# Altium PCB MainBoardPCB_4.PcbDoc (part 22 of 32)
Units mm, origin at the board's own origin, x right, y up, seen from the top; angles counter-clockwise.
Board outline 333.63 x 349.38 mm, 16 copper layers (L1, L2 (GND), L3 (Sign), L4 (GND), L5 (Sign), L6 (PWR/GND), L7(PWR/GND), L8 (Plane_GND), L9 (PWR/GND), L10 (PWR/GND), L11 (PWR/GND), L12 (Sign), L13 (GND), L14 (Sign), L15 (GND), L16), stack 2.502 mm thick; 2205 components, 1648 nets, 8314 pads, 3172 vias.
Unrouted connection lines stored in the file: 5141.
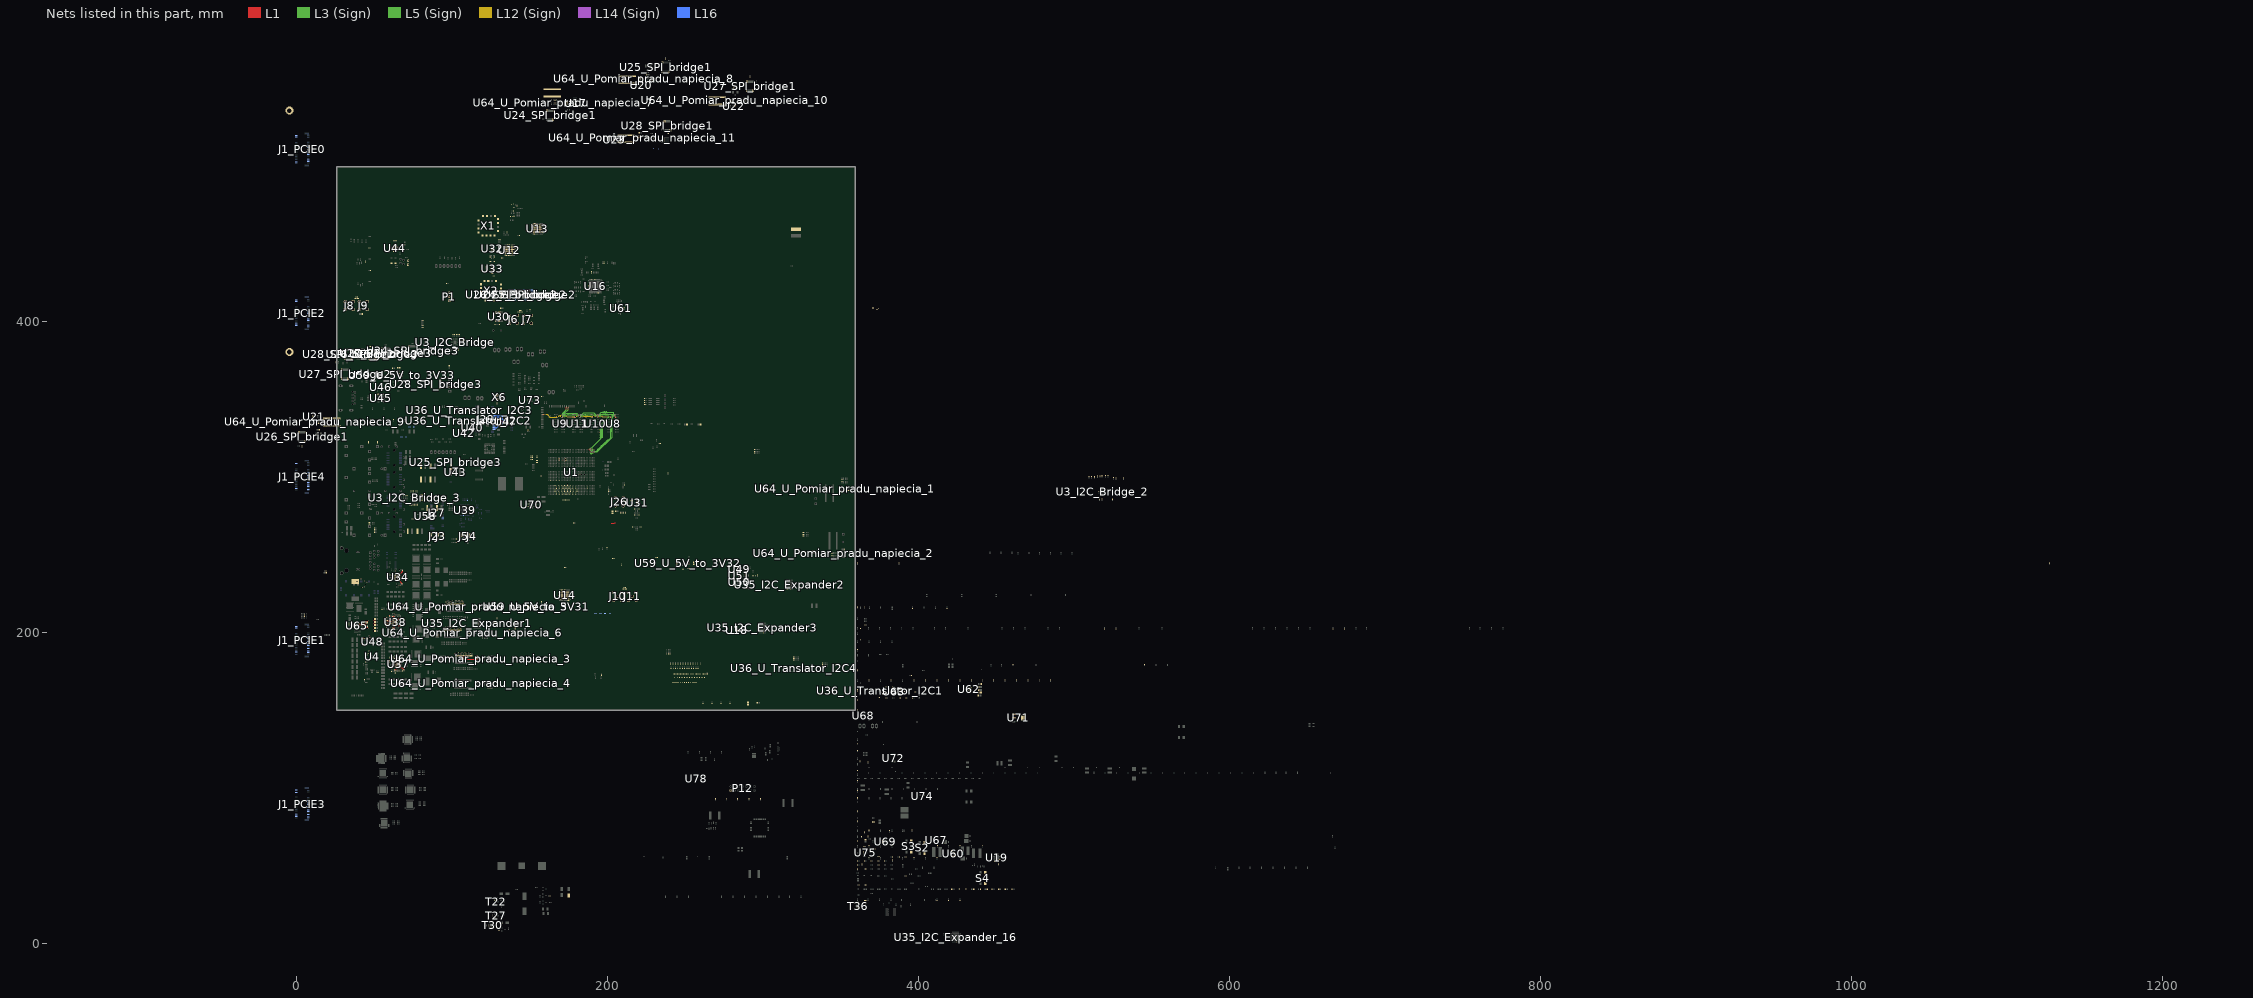
[diagram p22: the nets of this part, all layers, seen from the top]

## Via types
v1: diameter 0.5, hole 0.2, L1 to L16, tented both sides, 1153 vias
v2: diameter 0.5/0.35/0.35/0.35/0.35/0.35/0.35/0.35/0.35/0.35/0.35/0.35/0.35/0.35/0.35/0.5 (per signal layer), hole 0.2, L1 to L16, tented both sides, 548 vias
v3: diameter 0.5, hole 0.2, L1 to L16, 522 vias
v4: diameter 0.5/0.35/0.35/0.35/0.35/0.35/0.35/0.35/0.35/0.35/0.35/0.35/0.35/0.35/0.35/0.5 (per signal layer), hole 0.15, L1 to L16, tented both sides, 266 vias
v5: diameter 0.8, hole 0.4, L1 to L16, tented both sides, 164 vias
v6: diameter 0.35/0/0.35 (per signal layer), hole 0.127, L1 to L3 (Sign), tented both sides, 132 vias
v7: diameter 2.54, hole 1.02, L1 to L16, 125 vias
v8: diameter 1.4, hole 0.5, L1 to L16, tented both sides, 80 vias
v9: diameter 0.35, hole 0.127, L1 to L2 (GND), tented both sides, 36 vias
v10: diameter 0.4, hole 0.2, L1 to L16, 16 vias
v11: diameter 0.25, hole 0.2, L1 to L16, 16 vias
v12: diameter 5, hole 3, L1 to L16, 15 vias
v13: diameter 0.3, hole 0.2, L1 to L16, 15 vias
v14: diameter 0.45, hole 0.15, L1 to L16, 12 vias
v15: diameter 0.5/0.35/0.35/0.35/0.35/0.35/0.35/0.35/0.35/0.35/0.35/0.35/0.35/0.35/0.35/0.45 (per signal layer), hole 0.15, L1 to L16, tented both sides, 10 vias
v16: diameter 0.2/0/0.2 (per signal layer), hole 0.1, L1 to L3 (Sign), tented both sides, 9 vias
v17: diameter 0.4, hole 0.1, L1 to L16, 7 vias
v18: diameter 0.5, hole 0.2, L3 (Sign) to L6 (PWR/GND), tented both sides, 6 vias
v19: diameter 1.65, hole 1.65, L1 to L16, 6 vias
v20: diameter 1.15, hole 1.15, L1 to L16, 6 vias
v21: diameter 0.35/0/0.35 (per signal layer), hole 0.127, L14 (Sign) to L16, tented both sides, 5 vias
v22: diameter 0.2, hole 0.1, L1 to L16, 4 vias
v23: diameter 0.4, hole 0.2, L1 to L16, tented both sides, 2 vias
v24: diameter 0.4, hole 0.15, L1 to L16, 2 vias
v25: diameter 0.508, hole 0.127, L1 to L2 (GND), 2 vias
v26: diameter 0.508, hole 0.127, L2 (GND) to L3 (Sign), 2 vias
v27: diameter 0.5/0.35/0.35/0.35/0.35/0.35/0.35/0.35/0.35/0.35/0.35/0.35/0.35/0.35/0.35/0.5 (per signal layer), hole 0.15, L1 to L16, 2 vias
v28: diameter 0.35, hole 0.127, L3 (Sign) to L6 (PWR/GND), tented both sides, 2 vias
v29: diameter 5.5, hole 3.5, L1 to L16, 1 vias
v30: diameter 0.5/0.35/0.35/0.35/0.35/0.35/0.35/0.35/0.35/0.35/0.35/0.35/0.35/0.35/0.35/0.5 (per signal layer), hole 0.2, L1 to L16, 1 vias
v31: diameter 0.35/0.35/0.35 (per signal layer), hole 0.127, L1 to L3 (Sign), tented both sides, 1 vias
v32: diameter 0.45/0/0.45 (per signal layer), hole 0.15, L1 to L3 (Sign), tented both sides, 1 vias
v33: diameter 0.45/0/0.45 (per signal layer), hole 0.2, L14 (Sign) to L16, tented both sides, 1 vias
v34: diameter 0.35, hole 0.127, L2 (GND) to L3 (Sign), 1 vias
v35: diameter 0.35, hole 0.127, L1 to L2 (GND), 1 vias

## Nets (pads, with @x,y where several pads share a name; then routed paths per layer and width w, separated by ;. In a path a pad name is that pad's centre, name@x,y a point inside that pad or via, vN(x,y) a via of type N, cw(c..) or ccw(c..) an arc to the next point about the centre after c; other vN are vias at no path point) (continued)
3V3_RAIL: C303_I2C_Bridge.2 C303_I2C_Bridge_2.2 C303_I2C_Bridge_3.2 C309_U_Pomiar_pradu_napiecia_1.2 C309_U_Pomiar_pradu_napiecia_2.2 C309_U_Pomiar_pradu_napiecia_3.2 C309_U_Pomiar_pradu_napiecia_4.2 C309_U_Pomiar_pradu_napiecia_5.2 C309_U_Pomiar_pradu_napiecia_6.2 C309_U_Pomiar_pradu_napiecia_7.2 C309_U_Pomiar_pradu_napiecia_8.2 C309_U_Pomiar_pradu_napiecia_9.2 C309_U_Pomiar_pradu_napiecia_10.2 C309_U_Pomiar_pradu_napiecia_11.2 C310.2 C311_I2C_Expander1.2 C311_I2C_Expander2.2 C311_I2C_Expander3.2 C311_I2C_Expander?.2 C311_I2C_Expander_10.2 C311_I2C_Expander_11.2 C311_I2C_Expander_12.2 C311_I2C_Expander_13.2 C311_I2C_Expander_14.2 C311_I2C_Expander_15.2 C311_I2C_Expander_16.2 C324.2 C331.2 C339.2 C545.2 C546.2 C550.2 C552.2 C554.2 C562.2 C585.2 C623.2 C654.2 C676.2 C707.2 C708.2 C721.2 C732.2 C735.2 C792.2 FB1_PCIE0.2 FB1_PCIE1.2 FB1_PCIE2.2 FB1_PCIE3.2 FB1_PCIE4.2 FB23.1 FB24.1 J1_PCIE0.6 J1_PCIE0.8 J1_PCIE0.10 J1_PCIE1.6 J1_PCIE1.8 J1_PCIE1.10 J1_PCIE2.6 J1_PCIE2.8 J1_PCIE2.10 J1_PCIE3.6 J1_PCIE3.8 J1_PCIE3.10 J1_PCIE4.6 J1_PCIE4.8 J1_PCIE4.10 J28.4 L1.1 L2.1 L3.1 L4.1 L5.1 L6.1 L7.1 L8.1 P12.1 R3_I2C_Bridge.2 R3_I2C_Bridge_2.2 R3_I2C_Bridge_3.2 R4_I2C_Bridge.2 R4_I2C_Bridge_2.2 R4_I2C_Bridge_3.2 R5_I2C_Bridge.2 R5_I2C_Bridge_2.2 R5_I2C_Bridge_3.2 R6_I2C_Bridge.2 R6_I2C_Bridge_2.2 R6_I2C_Bridge_3.2 R7_I2C_Bridge.2 R7_I2C_Bridge_2.2 R7_I2C_Bridge_3.2 R8_I2C_Bridge.2 R8_I2C_Bridge_2.2 R8_I2C_Bridge_3.2 R9_I2C_Bridge.2 R9_I2C_Bridge_2.2 R9_I2C_Bridge_3.2 R10_I2C_Bridge.2 R10_I2C_Bridge_2.2 R10_I2C_Bridge_3.2 R11.1 R13.1 R16.1 R29.2 R30.2 R65.2 R66.2 R67.2 R68.2 R71.2 R72.2 R124.2 R175.1 R179.1 R184.1 R188.1 R193.1 R197.1 R202.1 R206.1 R211.1 R219.1 R223_I2C_Bridge.2 R223_I2C_Bridge_2.2 R223_I2C_Bridge_3.2 R224_I2C_Bridge.2 R224_I2C_Bridge_2.2 R224_I2C_Bridge_3.2 R225_I2C_Bridge.2 R225_I2C_Bridge_2.2 R225_I2C_Bridge_3.2 R226_I2C_Bridge.2 R226_I2C_Bridge_2.2 R226_I2C_Bridge_3.2 R227_I2C_Bridge.2 R227_I2C_Bridge_2.2 R227_I2C_Bridge_3.2 R230.1 R231_SPI_bridge1.2 R231_SPI_bridge2.2 R233_SPI_bridge1.2 R233_SPI_bridge2.2 R233_SPI_bridge3.2 R236_SPI_bridge1.2 R236_SPI_bridge2.2 R236_SPI_bridge3.2 R238_SPI_bridge1.2 R240_SPI_bridge1.2 R240_SPI_bridge2.2 R241.2 R243.2 R252.2 R253.2 R281.2 R287.2 R376.2 R377.2 R378.2 R388.1 R425.2 R426.2 R427.2 R428.2 R429.2 R448_U_Pomiar_pradu_napiecia_3.2 R449.2 R451.2 R453.2 R455.2 R458.2 R462.2 R463.1 R468.1 R469.2 R471.2 R473.2 R475.2 R477.2 R479.2 R492.2 R494.2 R496.2 R500.2 R502.2 R504.2 R508.2 R510.2 R512.2 R516.2 R518.2 R520.2 R524.2 R526.2 R528.2 R538.2 R558_I2C_Bridge.2 R558_I2C_Bridge_2.2 R558_I2C_Bridge_3.2 R559_I2C_Bridge.2 R559_I2C_Bridge_2.2 R559_I2C_Bridge_3.2 R560_I2C_Bridge.2 R560_I2C_Bridge_2.2 R560_I2C_Bridge_3.2 R562.1 R566.1 R570.1 R574.1 R578.1 R582.1 R586.1 R590.1 R596.1 R599.2 R600.2 R602.1 R603.1 R604.1 R605.1 R606.1 R630.1 R632.2 R633.2 R634.2 R646.1 R649.1 R676.2 R691.1 R697.2 R699.2 R701.2 R703.2 R705.2 R707.2 R730.2 R731.2 R732.2 R733.2 R734.2 R738.2 R740.2 R742.2 R746.2 R747.2 R748.2 R749.2 R750.2 R751.2 R752.2 R753.2 R754.2 R755.2 R756.2 R757.2 R758.2 R760.2 R762.2 R832.1 R833.1 R834.1 R835.1 U3_I2C_Bridge.21 U3_I2C_Bridge_2.21 U3_I2C_Bridge_3.21 U15.15 U18.C3 U18.D3 U18.D4 U18.E3 U18.E4 U18.F3 U18.F4 U19.13 U19.16 U24_SPI_bridge1.1 U24_SPI_bridge1.7 U24_SPI_bridge1.8 U24_SPI_bridge1.15 U24_SPI_bridge1.16 U24_SPI_bridge2.1 U24_SPI_bridge2.7 U24_SPI_bridge2.8 U24_SPI_bridge2.15 U24_SPI_bridge2.16 U24_SPI_bridge3.1 U24_SPI_bridge3.7 U24_SPI_bridge3.8 U24_SPI_bridge3.16 U25_SPI_bridge1.1 U25_SPI_bridge1.7 U25_SPI_bridge1.8 U25_SPI_bridge1.15 U25_SPI_bridge1.16 U25_SPI_bridge2.1 U25_SPI_bridge2.7 U25_SPI_bridge2.8 U25_SPI_bridge2.15 U25_SPI_bridge2.16 U25_SPI_bridge3.1 U25_SPI_bridge3.7 U25_SPI_bridge3.8 U25_SPI_bridge3.15 U25_SPI_bridge3.16 U26_SPI_bridge1.1 U26_SPI_bridge1.7 U26_SPI_bridge1.8 U26_SPI_bridge1.15 U26_SPI_bridge1.16 U26_SPI_bridge2.1 U26_SPI_bridge2.7 U26_SPI_bridge2.8 U26_SPI_bridge2.15 U26_SPI_bridge2.16 U26_SPI_bridge3.1 U26_SPI_bridge3.7 U26_SPI_bridge3.8 U26_SPI_bridge3.15 U26_SPI_bridge3.16 U27_SPI_bridge1.1 U27_SPI_bridge1.7 U27_SPI_bridge1.8 U27_SPI_bridge1.15 U27_SPI_bridge1.16 U27_SPI_bridge2.1 U27_SPI_bridge2.7 U27_SPI_bridge2.8 U27_SPI_bridge2.16 U27_SPI_bridge3.1 U27_SPI_bridge3.7 U27_SPI_bridge3.8 U27_SPI_bridge3.16 U28_SPI_bridge1.1 U28_SPI_bridge1.7 U28_SPI_bridge1.8 U28_SPI_bridge1.15 U28_SPI_bridge1.16 U28_SPI_bridge2.1 U28_SPI_bridge2.7 U28_SPI_bridge2.8 U28_SPI_bridge2.15 U28_SPI_bridge2.16 U28_SPI_bridge3.1 U28_SPI_bridge3.7 U28_SPI_bridge3.8 U28_SPI_bridge3.16 U35_I2C_Expander1.5 U35_I2C_Expander2.5 U35_I2C_Expander3.5 U35_I2C_Expander_16.5 U36_U_Translator_I2C1.7 U36_U_Translator_I2C2.2 U36_U_Translator_I2C2.7 U36_U_Translator_I2C3.2 U36_U_Translator_I2C3.7 U36_U_Translator_I2C4.7 U45.32 U47.A4 U49.1 U49.2 U50.1 U50.2 U51.1 U51.2 U58.5 U63.3 U64_U_Pomiar_pradu_napiecia_1.6 U64_U_Pomiar_pradu_napiecia_2.6 U64_U_Pomiar_pradu_napiecia_3.6 U64_U_Pomiar_pradu_napiecia_3.8 U64_U_Pomiar_pradu_napiecia_3.9 U64_U_Pomiar_pradu_napiecia_4.6 U64_U_Pomiar_pradu_napiecia_5.6 U64_U_Pomiar_pradu_napiecia_6.6 U64_U_Pomiar_pradu_napiecia_7.6 U64_U_Pomiar_pradu_napiecia_8.6 U64_U_Pomiar_pradu_napiecia_9.6 U64_U_Pomiar_pradu_napiecia_10.6 U64_U_Pomiar_pradu_napiecia_11.6 U67.1 U68.1 U69.1 U69.2 U69.3 U69.15 U69.16 U70.1 U70.2 U70.4 U70.5 U72.6 U73.2 U74.5 U78.5 | length 12.5
  L1 w0.254: U64_U_Pomiar_pradu_napiecia_3.9@116.278,182.659 U64_U_Pomiar_pradu_napiecia_3.8@116.278,183.159 ; U64_U_Pomiar_pradu_napiecia_3.6@116.278,184.159 116.278,184.858 v5(116.281,184.861)
  L1 w0.3: R448_U_Pomiar_pradu_napiecia_3.2@107.759,184.901 107.759,183.101 108.201,182.659 U64_U_Pomiar_pradu_napiecia_3.9@116.278,182.659
  L1 w0.5: v5(52.018,192.237) R630.1@52.018,193.051
  other v5: 112.903,186.048 109.306,186.088 111.104,186.068 107.508,186.109 105.71,186.129 103.911,186.149 102.113,186.169 110.215,186.977 112.014,186.957 108.417,186.998 106.619,187.018 103.022,187.058 104.821,187.038
  other v12: -4.475,380.276
5V_LN: C580.2 R443.2 R608.2 U12.42 U30.1 U30.5 U62.9 U62.10 X2.14
5V_RAIL: C515.2 C516.2 C563_U_5V_to_3V31.2 C563_U_5V_to_3V32.2 C563_U_5V_to_3V33.2 C564_U_5V_to_3V31.2 C564_U_5V_to_3V32.2 C564_U_5V_to_3V33.2 C574.2 C575.2 C720.2 C728.2 C733.2 D23.2 R315.2 R448_U_Pomiar_pradu_napiecia_6.2 R651.2 R656.2 T22.1 T27.2 T30.2 U40.1 U40.2 U40.3 U42.1 U42.2 U42.3 U45.21 U46.C3 U46.D3 U46.D4 U46.E3 U46.E4 U46.F3 U46.F4 U59_U_5V_to_3V31.1 U59_U_5V_to_3V31.2 U59_U_5V_to_3V32.1 U59_U_5V_to_3V32.2 U59_U_5V_to_3V33.1 U59_U_5V_to_3V33.2 U61.1 U61.2 U61.4 U61.5 U64_U_Pomiar_pradu_napiecia_6.8 U64_U_Pomiar_pradu_napiecia_6.9 U73.1
  other v5: 105.778,202.507 102.181,202.548 103.98,202.527 100.383,202.568 98.585,202.588 96.787,202.608 94.988,202.629 103.091,203.437 104.889,203.416 101.292,203.457 99.494,203.477 95.898,203.517 97.696,203.497
12V_HiSpeed: C304.1 C305.1 C306.1 C307.1 C604.2 C714.2 FB34.1 L15.1 R448_U_Pomiar_pradu_napiecia_5.2 R626.2 U17.C3 U17.D3 U17.D4 U17.E3 U17.E4 U17.F3 U17.F4 U19.9 U19.11 U19.26 U19.28 U20.C3 U20.D3 U20.D4 U20.E3 U20.E4 U20.F3 U20.F4 U21.C3 U21.D3 U21.D4 U21.E3 U21.E4 U21.F3 U21.F4 U22.C3 U22.D3 U22.D4 U22.E3 U22.E4 U22.F3 U22.F4 U23.C3 U23.D3 U23.D4 U23.E3 U23.E4 U23.F3 U23.F4 U64_U_Pomiar_pradu_napiecia_5.8 U64_U_Pomiar_pradu_napiecia_5.9 U71.1 | length 0.4
  L1 w0.254: R626.2@59.997,210.611 59.997,210.961
  other v5: 107.235,219.335 105.437,219.355 103.638,219.375 100.042,219.416 101.84,219.395 98.244,219.436 96.446,219.456 106.346,220.244 104.548,220.264 100.951,220.305 102.749,220.284 99.153,220.325 97.355,220.345
12V_PCIE0: R448_U_Pomiar_pradu_napiecia_7.1 U17.C2 U17.D1 U17.D2 U17.E1 U17.E2 U17.F1 U17.F2 U64_U_Pomiar_pradu_napiecia_7.10
12V_PCIE1: R448_U_Pomiar_pradu_napiecia_8.1 U20.C2 U20.D1 U20.D2 U20.E1 U20.E2 U20.F1 U20.F2 U64_U_Pomiar_pradu_napiecia_8.10
12V_PCIE2: R448_U_Pomiar_pradu_napiecia_9.1 U21.C2 U21.D1 U21.D2 U21.E1 U21.E2 U21.F1 U21.F2 U64_U_Pomiar_pradu_napiecia_9.10
12V_PCIE3: R448_U_Pomiar_pradu_napiecia_10.1 U22.C2 U22.D1 U22.D2 U22.E1 U22.E2 U22.F1 U22.F2 U64_U_Pomiar_pradu_napiecia_10.10
12V_PCIE4: R448_U_Pomiar_pradu_napiecia_11.1 U23.C2 U23.D1 U23.D2 U23.E1 U23.E2 U23.F1 U23.F2 U64_U_Pomiar_pradu_napiecia_11.10
+12V_PCIE0: J1_PCIE0.60 J1_PCIE0.62 J1_PCIE0.64 J1_PCIE0.66 R448_U_Pomiar_pradu_napiecia_7.2 U64_U_Pomiar_pradu_napiecia_7.8 U64_U_Pomiar_pradu_napiecia_7.9
+12V_PCIE1: J1_PCIE1.60 J1_PCIE1.62 J1_PCIE1.64 J1_PCIE1.66 R448_U_Pomiar_pradu_napiecia_8.2 U64_U_Pomiar_pradu_napiecia_8.8 U64_U_Pomiar_pradu_napiecia_8.9
+12V_PCIE2: J1_PCIE2.60 J1_PCIE2.62 J1_PCIE2.64 J1_PCIE2.66 R448_U_Pomiar_pradu_napiecia_9.2 U64_U_Pomiar_pradu_napiecia_9.8 U64_U_Pomiar_pradu_napiecia_9.9
+12V_PCIE3: J1_PCIE3.60 J1_PCIE3.62 J1_PCIE3.64 J1_PCIE3.66 R448_U_Pomiar_pradu_napiecia_10.2 U64_U_Pomiar_pradu_napiecia_10.8 U64_U_Pomiar_pradu_napiecia_10.9
+12V_PCIE4: J1_PCIE4.60 J1_PCIE4.62 J1_PCIE4.64 J1_PCIE4.66 R448_U_Pomiar_pradu_napiecia_11.2 U64_U_Pomiar_pradu_napiecia_11.8 U64_U_Pomiar_pradu_napiecia_11.9
\I\N\T\: R709.2 U39.44
\M\R\: D11.1 D12.1 P5.1 R371.1 U44.13
ADP1741_3.6V: C308.2 C354.2 C355.2 C570.2 C603.2 L13.2 R113.2 U60.1 U60.2 U60.3 U60.15 U60.16
ADP1741_EN: U35_I2C_Expander2.18 U60.4
ADP1741_PG: U35_I2C_Expander2.2 U60.5
ADP_Vin_1: C395.2 R285.2 U37.3
ADP_Vin_2: C436.2 R303.2 U38.3 | length 2.8
  L1 w0.254: C436.2@58.746,207.523 59.82,207.523 60.129,207.214 U38.3@61.453,207.214
AGND: C45.1 C46.1 C55.1 C56.1 C57.1 C58.1 C59.1 C60.1 C61.1 C62.1 C65.1 C66.1 C68.1 C69.1 C71.1 C72.1 C73.1 C74.1 C84.1 C85.1 C86.1 C87.1 C94.1 C95.1 C97.1 C98.1 C111.1 C112.1 C113.1 C114.1 C115.1 C116.1 C117.1 C118.1 C119.1 C120.1 C121.1 C122.1 C123.1 C128.1 C129.1 C130.1 C131.1 C132.1 C133.1 C134.1 C135.1 C136.1 C137.1 C138.1 C139.1 C140.1 C149.1 C150.1 C151.1 C152.1 C153.1 C154.1 C155.1 C156.1 C157.1 C158.1 C159.1 C160.1 C161.1 C166.1 C167.1 C168.1 C169.1 C170.1 C171.1 C172.1 C173.1 C174.1 C175.1 C176.1 C177.1 C178.1 C181.1 C182.1 C183.1 C184.1 C185.1 C186.1 C187.1 C188.1 C189.1 C190.1 C191.1 C192.1 C193.1 C194.1 C195.1 C196.1 C197.1 C198.1 C199.1 C200.1 C201.1 C202.1 C203.1 C204.1 C205.1 C206.1 C322.1 C323.1 C324.1 C326.1 C327.1 C328.1 C329.1 C335.1 C336.1 C337.1 C338.1 C339.1 C340.1 C344.2 C563_U_5V_to_3V31.1 C563_U_5V_to_3V32.1 C563_U_5V_to_3V33.1 C564_U_5V_to_3V31.1 C564_U_5V_to_3V32.1 C564_U_5V_to_3V33.1 C565_U_5V_to_3V31.1 C565_U_5V_to_3V32.1 C565_U_5V_to_3V33.1 C566_U_5V_to_3V31.1 C566_U_5V_to_3V32.1 C566_U_5V_to_3V33.1 C567_U_5V_to_3V31.1 C567_U_5V_to_3V32.1 C567_U_5V_to_3V33.1 C568.1 C569.1 C570.1 C571.2 C580.1 C581.1 C582.1 C583.1 C584.1 C713.1 C714.1 FB35.2 J2.1 J2.3 J3.1 J3.3 J4.1 J4.3 J5.1 J5.3 J6.2 J6.3 J6.4 J6.5 J7.2 J7.3 J7.4 J7.5 J8.2 J8.3 J8.4 J8.5 J9.2 J9.3 J9.4 J9.5 J10.2 J10.3 J10.4 J10.5 J11.2 J11.3 J11.4 J11.5 J26.2 J26.3 J26.4 J26.5 R246.1 R247.1 R248.1 R249.2 R254.1 R255.1 R256.1 R258.2 R261.1 R262.1 R263.1 R264.1 R265.1 R291.2 R301.2 R387.1 R432_U_5V_to_3V31.1 R432_U_5V_to_3V32.1 R432_U_5V_to_3V33.1 R434.1 R444.1 R445.1 R482.2 R483.2 R487.1 R536.2 R537.1 R609.1 T36.2 U12.36 U12.41 U12.53 U13.36 U13.41 U13.53 U14.36 U14.41 U14.53 U31.1 U31.2 U31.17 U32.1 U32.17 U33.5 U33.6 U33.14 U33.17 U59_U_5V_to_3V31.4 U59_U_5V_to_3V31.9 U59_U_5V_to_3V32.4 U59_U_5V_to_3V32.9 U59_U_5V_to_3V33.4 U59_U_5V_to_3V33.9 U60.6 U60.17 U62.5 U62.8 U62.11 U71.2 X1.1 X1.3 X1.4 X1.5 X1.6 X1.7 X1.8 X1.9 X1.11 X1.12 X1.13 X1.15 X1.16
  other v3: 421.804,57.122 422.904,57.122 421.804,58.222 422.904,58.222 431.927,162.814 432.689,162.814 431.927,163.576 432.689,163.576 431.927,164.338 432.689,164.338 153.862,215.991 154.862,215.991 153.862,216.991 154.862,216.991 169.726,221.726 170.826,221.726 171.926,221.726 173.026,221.726 174.126,221.726 175.226,221.726 169.726,222.826 170.826,222.826 171.926,222.826 173.026,222.826 174.126,222.826 175.226,222.826 169.726,223.926 170.826,223.926 171.926,223.926 173.026,223.926 174.126,223.926 175.226,223.926 169.726,225.026 170.826,225.026 171.926,225.026 173.026,225.026 174.126,225.026 175.226,225.026 169.726,226.126 170.826,226.126 171.926,226.126 173.026,226.126 174.126,226.126 175.226,226.126 251.341,243.886 252.341,243.886 251.341,244.886 252.341,244.886 67.28,364.904 68.28,364.904 67.28,365.904 68.28,365.904 134.296,443.43 135.396,443.43 136.496,443.43 137.596,443.43 138.696,443.43 139.796,443.43 134.296,444.53 135.396,444.53 136.496,444.53 137.596,444.53 138.696,444.53 139.796,444.53 134.296,445.63 135.396,445.63 136.496,445.63 137.596,445.63 138.696,445.63 139.796,445.63 134.296,446.73 135.396,446.73 136.496,446.73 137.596,446.73 138.696,446.73 139.796,446.73 134.296,447.83 135.396,447.83 136.496,447.83 137.596,447.83 138.696,447.83 139.796,447.83 152.3,457.342 153.4,457.342 154.5,457.342 155.6,457.342 156.7,457.342 157.8,457.342 152.3,458.442 153.4,458.442 154.5,458.442 155.6,458.442 156.7,458.442 157.8,458.442 152.3,459.542 153.4,459.542 154.5,459.542 155.6,459.542 156.7,459.542 157.8,459.542 152.3,460.642 153.4,460.642 154.5,460.642 155.6,460.642 156.7,460.642 157.8,460.642 152.3,461.742 153.4,461.742 154.5,461.742 155.6,461.742 156.7,461.742 157.8,461.742
  other v10: 125.627,433.289 126.577,433.289 125.627,434.239 126.577,434.239
  other v12: -4.475,535.508
AGND_1: C389.1 C393.1 C395.1 C398.1 C399.1 C639.1 C640.1 C641.1 C642.1 C643.1 C644.1 R290.1 R294.1 R300.1 U37.6 U37.33
  other v3: 64.825,178.017 66.025,178.017 63.875,178.967 64.825,178.967 66.025,178.967 66.975,178.967 63.875,180.167 64.825,180.167 66.025,180.167 66.975,180.167 64.825,181.117 66.025,181.117
AGND_2: C430.1 C434.1 C436.1 C439.1 C440.1 C548.1 C549.1 C647.1 C648.1 C650.1 C652.1 R312.1 R318.1 R627.1 U38.6 U38.33 | length 7.4
  L1 w0.254: R312.1@57.926,204.716 57.926,205.54 57.15,206.316 57.15,207.205 57.468,207.523 C436.1@57.967,207.523 ; 57.937,205.529 59.906,205.529 60.091,205.714 U38.6@61.453,205.714
  other v3: 63.103,204.914 64.303,204.914 62.153,205.864 63.103,205.864 64.303,205.864 65.253,205.864 62.153,207.064 63.103,207.064 64.303,207.064 65.253,207.064 63.103,208.014 64.303,208.014
  other v14: 60.944,210.483 62.953,211.029 63.953,211.044 62.838,212.229
Analog_In5: U1.AD14
  other v2: 185.397,301.539
Analog_In6: U1.AA14
  other v2: 182.397,301.539
Analog_In7: U1.AB14
  other v2: 183.397,301.539
ANGD: C345.1 C349.1 C351.1 C356.1 C357.1 C358.2 C634.1 C635.1 R273.1 U34.6 U34.33
  other v3: 64.472,233.839 65.672,233.839 63.522,234.789 64.472,234.789 65.672,234.789 66.622,234.789 63.522,235.989 64.472,235.989 65.672,235.989 66.622,235.989 64.472,236.939 65.672,236.939
  other v14: 66.055,230.182 64.44,230.197 59.876,233.839 60.241,236.629 63.839,239.52 66.32,240.47
B223_Rx0_N: J1_PCIE0.47 U1.W3
B223_Rx0_P: J1_PCIE0.49 U1.W4
B223_Rx1_N: J1_PCIE0.35 U1.V5
B223_Rx1_P: J1_PCIE0.37 U1.V6
B223_Rx2_N: J1_PCIE1.47 U1.T5
B223_Rx2_P: J1_PCIE1.49 U1.T6
B223_Rx3_N: J1_PCIE1.35 U1.R3
B223_Rx3_P: J1_PCIE1.37 U1.R4
B223_Tx0_to_C_N: C268.1 J1_PCIE0.41
B223_Tx0_to_C_P: C267.1 J1_PCIE0.43
B223_Tx0C_to_B_N: C268.2 U1.V1
B223_Tx0C_to_B_P: C267.2 U1.V2
B223_Tx1_to_C_N: C270.1 J1_PCIE0.29
B223_Tx1_to_C_P: C269.1 J1_PCIE0.31
B223_Tx1C_to_B_N: C270.2 U1.U3
B223_Tx1C_to_B_P: C269.2 U1.U4
B223_Tx2_to_C_N: C272.1 J1_PCIE1.41
B223_Tx2_to_C_P: C271.1 J1_PCIE1.43
B223_Tx2C_to_B_N: C272.2 U1.T1
B223_Tx2C_to_B_P: C271.2 U1.T2
B223_Tx3_to_C_N: C275.1 J1_PCIE1.29
B223_Tx3_to_C_P: C274.1 J1_PCIE1.31
B223_Tx3C_to_B_N: C275.2 U1.P1
B223_Tx3C_to_B_P: C274.2 U1.P2
B224_Rx0_N: J1_PCIE2.47 U1.P5
B224_Rx0_P: J1_PCIE2.49 U1.P6
B224_Rx1_N: J1_PCIE2.35 U1.M5
B224_Rx1_P: J1_PCIE2.37 U1.M6
B224_Rx2_N: J1_PCIE3.47 U1.L3
B224_Rx2_P: J1_PCIE3.49 U1.L4
B224_Rx3_N: J1_PCIE3.35 U1.K5
B224_Rx3_P: J1_PCIE3.37 U1.K6
B224_Tx0_to_C_N: C280.1 J1_PCIE2.41
B224_Tx0_to_C_P: C279.1 J1_PCIE2.43
B224_Tx0C_to_B_N: C280.2 U1.N3
B224_Tx0C_to_B_P: C279.2 U1.N4
B224_Tx1_to_C_N: C282.1 J1_PCIE2.29
B224_Tx1_to_C_P: C281.1 J1_PCIE2.31
B224_Tx1C_to_B_N: C282.2 U1.M1
B224_Tx1C_to_B_P: C281.2 U1.M2
B224_Tx2_to_C_N: C284.1 J1_PCIE3.41
B224_Tx2_to_C_P: C283.1 J1_PCIE3.43
B224_Tx2C_to_B_N: C284.2 U1.K1
B224_Tx2C_to_B_P: C283.2 U1.K2
B224_Tx3_to_C_N: C287.1 J1_PCIE3.29
B224_Tx3_to_C_P: C286.1 J1_PCIE3.31
B224_Tx3C_to_B_N: C287.2 U1.J3
B224_Tx3C_to_B_P: C286.2 U1.J4
B225_Rx0_N: J1_PCIE4.47 U1.H5
B225_Rx0_P: J1_PCIE4.49 U1.H6
B225_Rx1_N: J1_PCIE4.35 U1.G7
B225_Rx1_P: J1_PCIE4.37 U1.G8
B225_Rx2_N: J1_PCIE4.23 U1.F5
B225_Rx2_P: J1_PCIE4.25 U1.F6
  other v2: 167.397,293.539
B225_Rx3_N: J1_PCIE4.11 U1.E7
B225_Rx3_P: J1_PCIE4.13 U1.E8
B225_Tx0_to_C_N: C292.1 J1_PCIE4.41
B225_Tx0_to_C_P: C291.1 J1_PCIE4.43
B225_Tx0C_to_B_N: C292.2 U1.H1
B225_Tx0C_to_B_P: C291.2 U1.H2
B225_Tx1_to_C_N: C294.1 J1_PCIE4.29
B225_Tx1_to_C_P: C293.1 J1_PCIE4.31
B225_Tx1C_to_B_N: C294.2 U1.G3
B225_Tx1C_to_B_P: C293.2 U1.G4
  other v2: 168.397,291.539
B225_Tx2_to_C_N: C296.1 J1_PCIE4.19
B225_Tx2_to_C_P: C295.1 J1_PCIE4.17
B225_Tx2C_to_B_N: C296.2 U1.F1
B225_Tx2C_to_B_P: C295.2 U1.F2
B225_Tx3_to_C_N: C299.1 J1_PCIE4.7
B225_Tx3_to_C_P: C298.1 J1_PCIE4.5
B225_Tx3C_to_B_N: C299.2 U1.E3
B225_Tx3C_to_B_P: C298.2 U1.E4
B503_Ground: C531.2 C532.2 C533.2 C534.2 C535.1 C536.1 P5.2 R358.2 R359.2 R360.2 R361.2 R373.1 R720.2 S2.3 S2.4 S3.3 S3.4 S4.3 S4.4 U43.9 U43.10 U44.4 U44.5 U44.17 X6.2 | length 0.9
  L1 w0.2: C535.1@148.603,330.314 C536.1@149.543,330.314
  other v3: 62.87,446.303 63.97,446.303 62.87,447.403 63.97,447.403
  other v34: 149.073,330.314
  other v35: 149.073,330.314
Bank223_MGTREF0_C_N: C276.1 U1.R7
Bank223_MGTREF0_C_P: C273.1 U1.R8
Bank223_MGTREF1_C_N: C278.1 U1.N7
Bank223_MGTREF1_C_P: C277.1 U1.N8
  other v2: 174.397,295.539
Bank224_MGTREF0_C_N: C288.1 U1.L7
Bank224_MGTREF0_C_P: C285.1 U1.L8
Bank224_MGTREF1_C_N: C290.1 U1.J7
Bank224_MGTREF1_C_P: C289.1 U1.J8
Bank225_MGTREF0_C_N: C300.1 U1.H9
Bank225_MGTREF0_C_P: C297.1 U1.H10
Bank225_MGTREF1_C_N: C302.1 U1.F9
Bank225_MGTREF1_C_P: C301.1 U1.F10
Bank505_MGTRREF0_C_N: C526.2 R69.2 U1.M24 | length 0.7
  L1 w0.116: v2(172.909,311.052) U1.M24@173.397,311.539
Bank505_MGTRREF0_C_P: C525.2 R69.1 U1.M23 | length 0.7
  L1 w0.116: v2(172.909,310.052) U1.M23@173.397,310.539
Bank505_MGTRREF2_C_N: C528.2 R126.2 U1.K24
  other v2: 171.397,311.539
Bank505_MGTRREF2_C_P: C527.2 R126.1 U1.K23
  other v2: 171.397,310.539
Bank505_MGTRREF3_C_N: C530.2 R70.2 U1.H24 | length 0.7
  L1 w0.116: v2(168.909,312.027) U1.H24@169.397,311.539
Bank505_MGTRREF3_C_P: C529.2 R70.1 U1.H23 | length 0.7
  L1 w0.116: v2(168.909,311.027) U1.H23@169.397,310.539
Battery_PWR: P11.1 R679.2 R680.2 U48.2 | length 1.6
  L1 w0.5: R680.2@43.658,195.933 v5(43.658,196.747) ; R679.2@45.775,195.933 v5(45.775,196.747)
  other v5: 46.906,196.145 48.155,196.145 47.566,196.91 46.907,197.647
  other v10: 48.327,194.383
BST1: C346.1 U34.25 | length 2.7
  L1 w0.254: U34.25@66.822,237.639 66.822,237.71 66.824,237.712 66.895,237.712 68.336,239.154 C346.1@68.336,239.69
BST1_1: C390.1 U37.25
BST1_2: C431.1 U38.25 | length 1.7
  L1 w0.254: U38.25@65.453,208.714 66.596,208.714 66.996,209.114 C431.1@67.001,209.114
BST2: C350.1 U34.16 | length 2.6
  L1 w0.254: U34.16@66.822,233.139 66.822,232.556 67.929,231.449 67.929,231.245 C350.1@68.072,231.102
BST2_1: C394.1 U37.16 | length 2.8
  L1 w0.254: U37.16@67.175,177.317 68.028,177.317 69.151,176.194 C394.1@69.151,175.817
BST2_2: C435.1 U38.16 | length 1.7
  L1 w0.254: U38.16@65.453,204.214 66.661,204.214 67.011,203.864 C435.1@67.016,203.864
CAN1_RxD: R798.1 U63.1
CAN1_TxD: R799.1 U63.4
CAN_H: P6.2 R446.2 R447.2 U63.7 U75.2
CAN_L: P6.1 R446.1 R447.1 U63.6 U75.1
CD_H: J28.9 R381.1 R782.1 U47.D3
Charge_CAP_KEY: R658.2
CLK_Fanout_In_N: U1.AF5
CLK_Fanout_In_P: U1.AF6
CLK_GTR_T1_N: C528.1
CLK_GTR_T1_P: C527.1
CLK_GTR_T2_N: C526.1
CLK_GTR_T2_P: C525.1
CLK_GTR_T3_N: C530.1
CLK_GTR_T3_P: C529.1
CLK_Hi_Rail1_N: R270.1 U12.33 U13.38
CLK_Hi_Rail1_P: R270.2 U12.34 U13.37
CLK_Hi_Rail1_SysRef_N: R534.1 U12.30 U13.48
CLK_Hi_Rail1_SysRef_P: R534.2 U12.31 U13.47
CLK_Hi_Rail2_N: R539.1 U12.6 U14.38
CLK_Hi_Rail2_P: R539.2 U12.7 U14.37
CLK_Hi_Rail2_SysRef_N: R535.1 U12.3 U14.48
CLK_Hi_Rail2_SysRef_P: R535.2 U12.4 U14.47
CLK_M_OSC_In: C333.1 R257.2 U33.2 | length 2.7
  L1 w0.116: 202.539,270.281 202.585,270.281 203.543,270.281 204.555,270.281 204.674,270.4 205.194,270.4
CLK_NVME_Conn_N: J27.53 U14.13
CLK_NVME_Conn_P: J27.55 U14.12
CLK_Q223_T1_N: C276.2
CLK_Q223_T1_P: C273.2
CLK_Q224_T1_N: C288.2
CLK_Q224_T1_P: C285.2
CLK_Q225_T1_N: C300.2
CLK_Q225_T1_P: C297.2
CLK_Q226_T1_N: U1.B9
CLK_Q226_T1_P: U1.B10
CLK_SMA0_C_N: C48.2 J6.1
CLK_SMA0_C_P: C47.2 J7.1
CLK_SMA0_N: C48.1 R78.1 U12.9
CLK_SMA0_P: C47.1 R78.2 U12.10
CLK_SMA1_C_N: C50.2 J8.1
CLK_SMA1_C_P: C49.2 J9.1
CLK_SMA1_N: C50.1 R79.1 U13.3
CLK_SMA1_P: C49.1 R79.2 U13.4
CLK_SMA2_C_N: C52.2 J10.1
CLK_SMA2_C_P: C51.2 J11.1
CLK_SMA2_N: C52.1 R80.1 U14.34
CLK_SMA2_P: C51.1 R80.2 U14.33
CLKREF_R: R375.1 X6.3
CLKREQ: J27.52
CMD_SD: J28.3 U47.D4 | length 8
  L14 (Sign) w0.098: v33(129.927,337.233) 131.355,335.804 133.045,335.804 133.445,335.404 133.929,335.404 v21(134.329,335.004)
  L16 w0.098: J28.3@127.237,337.232 v33(129.927,337.233)
COMP1_1: C642.2 R624.2 U37.30 | length 2.7
  L1 w0.254: R624.2@63.175,183.31 63.195,183.29 64.155,183.29 C642.2@64.175,183.27 64.175,182.936 64.675,182.436 U37.30@64.675,181.817
COMP1_2: C548.2 R687.2 U38.30 | length 2.5
  L1 w0.254: R687.2@61.953,210.269 61.963,210.259 62.943,210.259 C548.2@62.953,210.249 U38.30@62.953,208.714
COMP2_1: C641.2 R623.2 U37.11 | length 2.6
  L1 w0.254: R623.2@63.12,175.907 63.14,175.927 64.155,175.927 C641.2@64.175,175.947 64.175,176.323 64.675,176.823 U37.11@64.675,177.317
COMP2_2: C650.2 R631.2 U38.11 | length 2.4
  L1 w0.254: R631.2@61.938,202.723 62.788,202.723 C650.2@62.828,202.764 62.828,203.439 62.953,203.564 U38.11@62.953,204.214
CSN: C694.2 C695.2 C696.2 C697.2 C698.2 C699.2 C700.2 R17.2 R140.2 R150.2 R666.2 U4.2 U65.10 | length 20.6
  L1 w0.254: U65.10@40.6,205.318 43.104,205.318 ; R150.2@43.102,206.468 43.102,205.319 43.104,205.318 ; R666.2@45.266,206.456 45.266,206.112 44.472,205.318 43.104,205.318
  L1 w0.5: R666.2@44.621,206.456 v1(44.621,207.543) ; R666.2@45.266,206.456 v1(45.266,207.543) ; R666.2@45.904,206.456 v1(45.904,207.543) ; v1(49.507,200.659) C699.2@50.594,200.659 ; v1(49.507,201.383) C699.2@50.593,201.383 ; v1(49.507,202.549) C696.2@50.594,202.549 ; v1(49.507,203.273) C696.2@50.593,203.273 ; v1(49.507,204.44) C697.2@50.594,204.44 ; v1(49.507,205.164) C697.2@50.594,205.164 ; v1(49.507,206.33) C695.2@50.594,206.33 ; v1(49.507,207.054) C695.2@50.593,207.054 ; v1(49.507,208.221) C698.2@50.594,208.221 ; v1(49.507,208.944) C698.2@50.594,208.944
  other v5: 46.939,186.483 48.188,186.483 47.599,187.248 46.94,187.985
  other v10: 48.36,184.721
CSP: L22.2 R666.1 U65.9 | length 8.6
  L1 w0.254: U65.9@40.6,204.818 44.43,204.818 45.266,203.981 R666.1@45.266,203.657
  L1 w0.5: v1(44.629,202.57) R666.1@44.629,203.657 ; v1(45.266,202.57) R666.1@45.266,203.657 ; v1(45.912,202.57) R666.1@45.912,203.657
  other v5: 42.02,228.866 43.644,229.333 37.109,230.581 39.58,230.581 44.463,230.811 45.281,232.29 39.025,232.804 43.802,233.108 41.58,234.493
CSU: P1.2 R783.1
CSU_Neg: P1.3 R109.2
CSU_Pos: P1.1 R106.2
D_05028_G0: R540.2 U1.AA15 U16.45
  other v2: 182.397,302.539
D_05028_G0_1: R540.1
D_05028_G3: U16.40
D_05028_G4: U16.41
D_05028_G5: U16.12
D_05028_G6: U16.13
D_05028_S0: U16.55
D_05028_S1: U16.56
DAC1220_Vref: C320.2 R608.1 R609.2 U30.12
DAC_AGND: U30.4 U30.13 X2.1 X2.3 X2.4 X2.5 X2.6 X2.7 X2.8 X2.9 X2.11 X2.12 X2.13 X2.15 X2.16
DAC_OUT: C321.2 U30.11 X2.2
DAC_SPI_CLK: U26_SPI_bridge3.14 U30.16
DAC_SPI_MOSI: R481.1 U26_SPI_bridge3.12 U30.15
DAS/DSS#: J27.10
DATA0_SD: J28.7 U47.D5 | length 7.6
  L16 w0.098: J28.7@127.237,332.832 127.468,333.064 130.429,333.064 131.61,334.244 132.563,334.244 133.324,335.004 U47.D5@133.927,335.004
DATA1_SD: J28.8 U47.E5 | length 7.9
  L16 w0.098: J28.8@127.237,331.732 128.871,331.732 129.876,332.737 130.384,332.737 131.692,334.046 132.797,334.046 133.356,334.604 U47.E5@133.927,334.604
DATA2_SD: J28.1 U47.A5 | length 8.6
  L16 w0.098: J28.1@127.237,339.432 131.629,339.432 132.374,338.687 132.374,337.757 U47.A5@133.927,336.204
DATA3_SD: J28.2 R383.1 U47.B5 | length 7.7
  L16 w0.098: J28.2@127.452,338.336 130.729,338.336 130.975,338.09 130.975,337.798 131.844,336.928 132.556,336.928 133.68,335.804 U47.B5@133.927,335.804
Data_2_RX_PCIE0_N: J1_PCIE0.23
Data_2_RX_PCIE0_P: J1_PCIE0.25
Data_2_RX_PCIE1_N: J1_PCIE1.23
Data_2_RX_PCIE1_P: J1_PCIE1.25
Data_2_RX_PCIE2_N: J1_PCIE2.23
Data_2_RX_PCIE2_P: J1_PCIE2.25
Data_2_RX_PCIE3_N: J1_PCIE3.23
Data_2_RX_PCIE3_P: J1_PCIE3.25
Data_2_TX_PCIE0_N: J1_PCIE0.19
Data_2_TX_PCIE0_P: J1_PCIE0.17
Data_2_TX_PCIE1_N: J1_PCIE1.19
Data_2_TX_PCIE1_P: J1_PCIE1.17
Data_2_TX_PCIE2_N: J1_PCIE2.19
Data_2_TX_PCIE2_P: J1_PCIE2.17
Data_2_TX_PCIE3_N: J1_PCIE3.19
Data_2_TX_PCIE3_P: J1_PCIE3.17
Data_3_RX_PCIE0_N: J1_PCIE0.11
Data_3_RX_PCIE0_P: J1_PCIE0.13
Data_3_RX_PCIE1_N: J1_PCIE1.11
Data_3_RX_PCIE1_P: J1_PCIE1.13
Data_3_RX_PCIE2_N: J1_PCIE2.11
Data_3_RX_PCIE2_P: J1_PCIE2.13
Data_3_RX_PCIE3_N: J1_PCIE3.11
Data_3_RX_PCIE3_P: J1_PCIE3.13
Data_3_TX_PCIE0_N: J1_PCIE0.7
Data_3_TX_PCIE0_P: J1_PCIE0.5
Data_3_TX_PCIE1_N: J1_PCIE1.7
Data_3_TX_PCIE1_P: J1_PCIE1.5
Data_3_TX_PCIE2_N: J1_PCIE2.7
Data_3_TX_PCIE2_P: J1_PCIE2.5
Data_3_TX_PCIE3_N: J1_PCIE3.7
Data_3_TX_PCIE3_P: J1_PCIE3.5
DDR4_A0: R31.1 U1.AH30 U8.P3 U9.P3 U10.P3 U11.P3 | length 101.4
  L1 w0.116: v4(170.472,338.864) U9.P3@170.876,338.46 ; v4(181.933,338.864) U11.P3@182.336,338.46 ; U1.AH30@189.397,317.539 v6(189.884,318.027) ; v4(193.393,338.864) U10.P3@193.797,338.46 ; v15(204.853,338.864) U8.P3@205.257,338.46
  L1 w0.155: v6(174.855,343.555) R31.1@174.855,344.8
  L5 (Sign) w0.092: v4(170.472,338.864) 171.003,338.864 171.42,339.28 173.296,339.28 174.076,340.06 174.498,340.06 174.632,340.06 cw(c174.632,339.971) 174.722,339.971 174.722,339.917 ccw(c174.811,339.917) 174.811,339.828 175.08,339.828 ccw(c175.08,339.917) 175.17,339.917 175.17,339.971 cw(c175.259,339.971) 175.259,340.06 176.111,340.06 180.091,340.06 181.287,338.864 v4(181.933,338.864) 182.528,338.864 182.944,339.28 183.962,339.28 184.742,340.06 185.649,340.06 185.752,340.06 ccw(c185.752,340.13) 185.822,340.13 185.822,340.205 cw(c185.891,340.205) 185.891,340.274 186.099,340.274 cw(c186.099,340.205) 186.168,340.205 186.168,340.06 186.168,339.916 ccw(c186.237,339.916) 186.237,339.847 186.445,339.847 ccw(c186.445,339.916) 186.514,339.916 186.514,339.991 cw(c186.583,339.991) 186.583,340.06 186.944,340.06 191.829,340.06 193.025,338.864 v4(193.393,338.864) 193.902,338.864 194.281,339.242 195.294,339.242 196.17,340.119 196.647,340.119 cw(c196.647,340.029) 196.736,340.029 196.736,339.923 ccw(c196.826,339.923) 196.826,339.833 197.094,339.833 ccw(c197.094,339.923) 197.184,339.923 197.184,340.119 197.184,340.314 cw(c197.273,340.314) 197.273,340.404 197.542,340.404 cw(c197.542,340.314) 197.632,340.314 197.632,340.119 197.632,339.923 ccw(c197.721,339.923) 197.721,339.833 197.99,339.833 ccw(c197.99,339.923) 198.08,339.923 198.08,340.119 198.08,340.314 cw(c198.169,340.314) 198.169,340.404 198.438,340.404 cw(c198.438,340.314) 198.527,340.314 198.527,340.119 198.527,339.923 ccw(c198.617,339.923) 198.617,339.833 198.886,339.833 ccw(c198.886,339.923) 198.975,339.923 198.975,340.119 198.975,340.314 cw(c199.065,340.314) 199.065,340.404 199.333,340.404 cw(c199.333,340.314) 199.423,340.314 199.423,340.119 199.423,339.923 ccw(c199.512,339.923) 199.512,339.833 199.781,339.833 ccw(c199.781,339.923) 199.871,339.923 199.871,340.119 199.871,340.314 cw(c199.96,340.314) 199.96,340.404 200.229,340.404 cw(c200.229,340.314) 200.319,340.314 200.319,340.119 200.319,340.034 ccw(c200.408,340.034) 200.408,339.945 200.677,339.945 ccw(c200.677,340.034) 200.766,340.034 cw(c200.851,340.034) 200.851,340.119 200.99,340.119 203.022,340.119 204.102,339.039 204.678,339.039 v15(204.853,338.864)
  L3 (Sign) w0.092: v4(170.472,338.864) 171.003,338.864 171.739,339.6 171.739,340.77 171.922,340.953 172.538,340.953 172.671,341.085 ; v6(189.884,318.027) 190.395,318.027 190.64,317.782 190.64,317.763 190.692,317.71 ; 190.692,317.709 190.74,317.661 190.74,317.349 190.517,317.125 190.303,317.125 190.081,317.348 189.55,317.348 189.36,317.158 189.36,316.828 189.738,316.449 189.738,315.504 189.479,315.245 189.479,314.952 189.674,314.757 189.7,314.757 189.751,314.706 190.024,314.706 190.452,315.134 190.452,315.263 190.728,315.539 190.896,315.539 191.437,316.081 193.641,316.081 203.086,325.526 203.086,328.902 203.086,329.13 ccw(c202.999,329.13) 202.999,329.217 202.511,329.217 cw(c202.511,329.303) 202.424,329.303 202.424,329.476 cw(c202.511,329.476) 202.511,329.563 203.086,329.563 203.093,329.563 ccw(c203.093,329.649) 203.179,329.649 203.179,329.822 ccw(c203.093,329.822) 203.093,329.909 203.086,329.909 202.981,329.909 cw(c202.981,329.996) 202.894,329.996 202.894,330.169 cw(c202.981,330.169) 202.981,330.255 203.086,330.255 203.093,330.255 ccw(c203.093,330.342) 203.179,330.342 203.179,330.515 ccw(c203.093,330.515) 203.093,330.601 203.086,330.601 202.994,330.601 cw(c202.994,330.688) 202.907,330.688 202.907,330.861 cw(c202.994,330.861) 202.994,330.948 203.086,330.948 203.093,330.948 ccw(c203.093,331.034) 203.179,331.034 203.179,331.207 ccw(c203.093,331.207) 203.093,331.294 203.086,331.294 202.511,331.294 cw(c202.511,331.38) 202.424,331.38 202.424,331.553 cw(c202.511,331.553) 202.511,331.64 203.086,331.64 203.093,331.64 ccw(c203.093,331.727) 203.179,331.727 203.179,331.9 ccw(c203.093,331.9) 203.093,331.986 203.086,331.986 202.511,331.986 cw(c202.511,332.073) 202.424,332.073 202.424,332.246 cw(c202.511,332.246) 202.511,332.332 202.999,332.332 ccw(c202.999,332.419) 203.086,332.419 203.086,332.506 203.128,332.548 203.128,332.856 203.122,332.862 203.122,333.257 203.122,333.337 ccw(c203.023,333.337) 203.023,333.436 202.839,333.436 cw(c202.839,333.536) 202.74,333.536 202.74,333.734 cw(c202.839,333.734) 202.839,333.833 203.122,333.833 203.143,333.833 ccw(c203.143,333.933) 203.242,333.933 203.242,334.131 ccw(c203.143,334.131) 203.143,334.23 203.122,334.23 202.844,334.23 cw(c202.844,334.33) 202.744,334.33 202.744,334.528 cw(c202.844,334.528) 202.844,334.627 203.122,334.627 203.143,334.627 ccw(c203.143,334.727) 203.242,334.727 203.242,334.925 ccw(c203.143,334.925) 203.143,335.024 203.122,335.024 202.844,335.024 cw(c202.844,335.124) 202.745,335.124 202.745,335.322 cw(c202.844,335.322) 202.844,335.421 203.122,335.421 203.143,335.421 ccw(c203.143,335.521) 203.242,335.521 203.242,335.719 ccw(c203.143,335.719) 203.143,335.818 cw(c203.143,335.839) 203.122,335.839 203.122,336.017 203.456,336.351 203.456,339.499 203.949,339.992 204.174,339.992 204.432,339.734 204.432,339.407 204.559,339.28 204.768,339.28 204.853,339.195 v15(204.853,338.864)
  L3 (Sign) w0.151: 172.671,341.085 174.855,343.27 v6(174.855,343.555)
DDR4_A1: R33.1 U1.AG30 U8.P4 U9.P4 U10.P4 U11.P4 | length 100.3
  L1 w0.116: U9.P4@167.676,338.46 168.072,338.857 v4(168.075,338.857) ; U11.P4@179.136,338.46 179.533,338.857 v4(179.535,338.857) ; U1.AG30@188.397,317.539 v6(188.884,318.027) ; U10.P4@190.597,338.46 190.993,338.857 v4(190.995,338.857) v4@190.954,338.815 ; v15(201.646,338.856) U8.P4@202.049,338.453
  L1 w0.155: R33.1@158.737,340.144 v1(159.982,340.144)
  L12 (Sign) w0.092: 165.251,338.46 166.723,338.46 167.356,338.46 167.711,338.815 168.033,338.815 v4(168.075,338.857) ; v4@168.072,338.857 v4(168.075,338.857) ; v4@179.533,338.857 v4(179.535,338.857) ; v15(201.646,338.856) 201.379,338.856 201.058,338.536 196.832,338.536 196.108,339.26 194.843,339.26 194.709,339.26 ccw(c194.709,339.171) 194.62,339.171 194.62,338.947 cw(c194.53,338.947) 194.53,338.858 194.261,338.858 cw(c194.261,338.947) 194.172,338.947 194.172,339.26 194.172,339.573 ccw(c194.082,339.573) 194.082,339.663 193.813,339.663 ccw(c193.813,339.573) 193.724,339.573 193.724,339.26 193.724,339.241 cw(c193.634,339.241) 193.634,339.152 193.366,339.152 cw(c193.366,339.241) 193.276,339.241 193.276,339.26 193.276,339.349 ccw(c193.187,339.349) 193.187,339.439 192.918,339.439 ccw(c192.918,339.349) 192.828,339.349 192.828,339.26 192.828,338.947 cw(c192.739,338.947) 192.739,338.858 192.47,338.858 cw(c192.47,338.947) 192.381,338.947 192.381,339.171 ccw(c192.291,339.171) 192.291,339.26 191.795,339.26 191.636,339.26 191.232,338.857 v4(190.995,338.857) 190.954,338.815 190.632,338.815 190.335,338.518 189.586,338.518 189.24,338.864 187.088,338.864 186.984,338.864 ccw(c186.984,338.795) 186.914,338.795 186.914,338.77 cw(c186.845,338.77) 186.845,338.701 186.637,338.701 cw(c186.637,338.77) 186.568,338.77 186.568,338.864 186.568,338.97 ccw(c186.499,338.97) 186.499,339.04 186.291,339.04 ccw(c186.291,338.97) 186.222,338.97 186.222,338.864 186.222,338.77 cw(c186.153,338.77) 186.153,338.701 185.945,338.701 cw(c185.945,338.77) 185.876,338.77 185.876,338.864 185.876,338.97 ccw(c185.807,338.97) 185.807,339.04 185.599,339.04 ccw(c185.599,338.97) 185.53,338.97 185.53,338.933 cw(c185.46,338.933) 185.46,338.864 185.204,338.864 184.935,338.864 184.633,339.166 183.804,339.166 183.715,339.255 180.886,339.255 180.488,338.857 v4(179.535,338.857) ; v4(168.075,338.857) 168.651,338.857 169.055,339.26 169.189,339.26 ccw(c169.189,339.35) 169.279,339.35 169.279,339.404 cw(c169.368,339.404) 169.368,339.493 169.637,339.493 cw(c169.637,339.404) 169.727,339.404 169.727,339.26 169.727,339.117 ccw(c169.816,339.117) 169.816,339.027 170.085,339.027 ccw(c170.085,339.117) 170.175,339.117 170.175,339.171 cw(c170.264,339.171) 170.264,339.26 170.472,339.26 173.402,339.26 174.126,338.536 179.214,338.536 v4(179.535,338.857)
  L12 (Sign) w0.151: v1(159.982,340.144) 161.387,340.144 163.071,338.46 165.251,338.46
  L3 (Sign) w0.092: v6(188.884,318.027) 189.551,318.694 189.968,318.694 195.968,324.694 195.968,324.965 195.968,325.064 ccw(c195.869,325.064) 195.869,325.164 195.517,325.164 cw(c195.517,325.263) 195.418,325.263 195.418,325.461 cw(c195.517,325.461) 195.517,325.561 195.968,325.561 196.862,325.561 ccw(c196.862,325.66) 196.961,325.66 196.961,325.858 ccw(c196.862,325.858) 196.862,325.958 195.968,325.958 195.517,325.958 cw(c195.517,326.057) 195.418,326.057 195.418,326.255 cw(c195.517,326.255) 195.517,326.355 195.968,326.355 196.874,326.355 ccw(c196.874,326.454) 196.974,326.454 196.974,326.652 ccw(c196.874,326.652) 196.874,326.752 195.968,326.752 195.517,326.752 cw(c195.517,326.851) 195.418,326.851 195.418,327.049 cw(c195.517,327.049) 195.517,327.149 195.968,327.149 196.874,327.149 ccw(c196.874,327.248) 196.974,327.248 196.974,327.446 ccw(c196.874,327.446) 196.874,327.546 195.968,327.546 195.517,327.546 cw(c195.517,327.645) 195.418,327.645 195.418,327.843 cw(c195.517,327.843) 195.517,327.943 195.968,327.943 196.874,327.943 ccw(c196.874,328.042) 196.974,328.042 196.974,328.24 ccw(c196.874,328.24) 196.874,328.34 195.968,328.34 195.517,328.34 cw(c195.517,328.439) 195.418,328.439 195.418,328.637 cw(c195.517,328.637) 195.517,328.737 195.968,328.737 196.874,328.737 ccw(c196.874,328.836) 196.974,328.836 196.974,329.034 ccw(c196.874,329.034) 196.874,329.134 195.968,329.134 195.517,329.134 cw(c195.517,329.233) 195.418,329.233 195.418,329.431 cw(c195.517,329.431) 195.517,329.531 195.968,329.531 196.874,329.531 ccw(c196.874,329.63) 196.974,329.63 196.974,329.828 ccw(c196.874,329.828) 196.874,329.928 195.968,329.928 195.517,329.928 cw(c195.517,330.027) 195.418,330.027 195.418,330.225 cw(c195.517,330.225) 195.517,330.325 195.968,330.325 196.874,330.325 ccw(c196.874,330.424) 196.974,330.424 196.974,330.622 ccw(c196.874,330.622) 196.874,330.722 195.968,330.722 195.933,330.722 cw(c195.933,330.821) 195.833,330.821 195.833,331.019 cw(c195.933,331.019) 195.933,331.119 195.918,331.119 ccw(c195.918,331.169) 195.968,331.169 195.968,331.241 195.968,331.549 196.63,332.21 196.63,334.457 200.602,338.43 200.947,338.43 201.088,338.571 201.093,338.571 201.379,338.856 v15(201.646,338.856)
DDR4_A2: R35.1 U1.AK29 U8.R3 U9.R3 U10.R3 U11.R3 | length 99
  L1 w0.116: v4(170.472,339.664) U9.R3@170.876,339.26 ; v4(181.933,339.664) U11.R3@182.336,339.26 ; v6(190.909,316.052) U1.AK29@191.397,316.539 ; v4(193.393,339.664) U10.R3@193.797,339.26 ; v15(204.853,339.664) U8.R3@205.257,339.26
  L1 w0.155: v6(173.646,343.555) R35.1@173.646,344.8
  L5 (Sign) w0.092: v4(170.472,339.664) 170.901,339.664 171.305,340.068 172.536,340.068 173.449,340.981 180.235,340.981 180.335,340.881 cw(c180.276,340.822) 180.335,340.764 ccw(c180.398,340.701) 180.335,340.637 180.525,340.447 ccw(c180.588,340.511) 180.651,340.447 cw(c180.71,340.389) 180.768,340.447 181.326,339.89 181.552,339.664 v4(181.933,339.664) 182.433,339.664 182.837,340.068 183.672,340.068 184.891,341.287 186.792,341.287 186.987,341.287 cw(c186.987,341.218) 187.056,341.218 187.056,341.216 ccw(c187.125,341.216) 187.125,341.147 187.333,341.147 ccw(c187.333,341.216) 187.402,341.216 187.402,341.218 cw(c187.471,341.218) 187.471,341.287 187.748,341.287 187.922,341.287 188.299,341.287 cw(c188.299,341.218) 188.368,341.218 188.368,341.216 ccw(c188.437,341.216) 188.437,341.147 188.645,341.147 ccw(c188.645,341.216) 188.714,341.216 188.714,341.218 cw(c188.783,341.218) 188.783,341.287 188.887,341.287 191.389,341.287 193.012,339.664 v4(193.393,339.664) 193.822,339.664 194.226,340.068 195.277,340.068 195.516,340.307 195.516,340.906 196.164,341.554 196.913,341.554 197.164,341.554 ccw(c197.164,341.643) 197.254,341.643 197.254,341.758 cw(c197.344,341.758) 197.344,341.848 197.612,341.848 cw(c197.612,341.758) 197.702,341.758 197.702,341.554 197.702,341.349 ccw(c197.791,341.349) 197.791,341.26 198.06,341.26 ccw(c198.06,341.349) 198.15,341.349 198.15,341.554 198.15,341.658 cw(c198.239,341.658) 198.239,341.748 198.508,341.748 cw(c198.508,341.658) 198.597,341.658 198.597,341.554 198.597,341.349 ccw(c198.687,341.349) 198.687,341.26 198.956,341.26 ccw(c198.956,341.349) 199.045,341.349 199.045,341.554 199.045,341.658 cw(c199.135,341.658) 199.135,341.748 199.403,341.748 cw(c199.403,341.658) 199.493,341.658 199.493,341.554 199.493,341.349 ccw(c199.583,341.349) 199.583,341.26 199.851,341.26 ccw(c199.851,341.349) 199.941,341.349 199.941,341.464 cw(c200.03,341.464) 200.03,341.554 200.165,341.554 204.127,341.554 204.23,341.451 204.23,340.289 204.853,339.666 v15(204.853,339.664)
  L3 (Sign) w0.092: v4(170.472,339.664) 170.901,339.664 171.317,340.079 171.317,340.881 171.456,341.02 171.471,341.02 171.536,341.085 ; v6(190.909,316.052) 191.179,316.322 193.462,316.322 193.533,316.392 ccw(c193.462,316.462) 193.533,316.532 193.212,316.853 cw(c193.282,316.924) 193.212,316.994 193.352,317.134 cw(c193.422,317.064) 193.492,317.134 193.884,316.743 ccw(c193.954,316.813) 194.024,316.743 194.164,316.883 ccw(c194.094,316.953) 194.164,317.024 193.773,317.415 cw(c193.843,317.485) 193.773,317.555 193.913,317.696 cw(c193.984,317.625) 194.054,317.696 194.445,317.304 ccw(c194.515,317.374) 194.585,317.304 194.726,317.445 ccw(c194.656,317.515) 194.726,317.585 194.416,317.895 cw(c194.486,317.965) 194.416,318.035 194.556,318.175 cw(c194.627,318.105) 194.697,318.175 195.006,317.866 ccw(c195.077,317.936) 195.147,317.866 195.287,318.006 ccw(c195.217,318.076) 195.287,318.146 195.021,318.412 cw(c195.092,318.482) 195.021,318.553 195.162,318.693 cw(c195.232,318.623) 195.302,318.693 195.568,318.427 ccw(c195.638,318.497) 195.708,318.427 195.849,318.568 ccw(c195.778,318.638) 195.849,318.708 195.508,319.048 cw(c195.579,319.118) 195.508,319.188 195.649,319.329 cw(c195.719,319.259) 195.789,319.329 196.129,318.989 ccw(c196.199,319.059) 196.27,318.989 196.41,319.129 ccw(c196.34,319.199) 196.41,319.269 196.093,319.586 cw(c196.163,319.657) 196.093,319.727 196.233,319.867 cw(c196.304,319.797) 196.374,319.867 196.691,319.55 ccw(c196.761,319.62) 196.831,319.55 196.971,319.69 ccw(c196.901,319.761) 196.971,319.831 196.707,320.095 cw(c196.778,320.165) 196.707,320.235 196.848,320.376 cw(c196.918,320.305) 196.988,320.376 197.252,320.112 ccw(c197.322,320.182) 197.393,320.112 197.533,320.252 ccw(c197.463,320.322) 197.533,320.392 197.269,320.656 cw(c197.34,320.726) 197.269,320.796 197.41,320.936 cw(c197.48,320.866) 197.55,320.936 197.814,320.673 ccw(c197.884,320.743) 197.954,320.673 198.094,320.813 ccw(c198.024,320.884) 198.094,320.954 197.769,321.279 cw(c197.839,321.349) 197.769,321.419 197.909,321.56 cw(c197.98,321.489) 198.05,321.56 198.375,321.234 ccw(c198.445,321.305) 198.515,321.234 198.656,321.375 ccw(c198.586,321.445) 198.656,321.515 198.358,321.813 cw(c198.428,321.883) 198.358,321.953 198.499,322.093 cw(c198.569,322.023) 198.639,322.093 198.937,321.796 ccw(c199.007,321.866) 199.077,321.796 199.217,321.936 ccw(c199.147,322.006) 199.217,322.077 198.955,322.338 cw(c199.026,322.409) 198.955,322.479 199.096,322.619 cw(c199.166,322.549) 199.236,322.619 199.498,322.357 ccw(c199.568,322.427) 199.638,322.357 199.779,322.498 ccw(c199.708,322.568) 199.779,322.638 199.444,322.973 cw(c199.514,323.043) 199.444,323.113 199.584,323.253 cw(c199.654,323.183) 199.725,323.253 200.059,322.919 ccw(c200.13,322.989) 200.2,322.919 200.34,323.059 ccw(c200.27,323.129) 200.34,323.199 200.079,323.46 cw(c200.15,323.53) 200.079,323.6 200.22,323.741 cw(c200.29,323.671) 200.36,323.741 200.621,323.48 ccw(c200.691,323.55) 200.761,323.48 200.902,323.621 ccw(c200.831,323.691) 200.902,323.761 201.068,323.928 201.077,323.928 201.147,323.998 201.154,323.991 201.215,324.052 201.215,324.074 201.247,324.106 201.269,324.106 201.33,324.167 201.323,324.174 201.393,324.244 201.393,324.253 202.135,324.994 202.135,326.499 202.057,326.576 202.057,335.669 202.253,335.864 202.578,335.864 202.969,336.255 202.969,337.779 203.249,338.06 203.249,339.66 203.898,340.309 204.208,340.309 v15(204.853,339.664)
  L3 (Sign) w0.151: 171.536,341.085 173.63,343.18 173.63,343.539 v6(173.646,343.555)